# Altium PCB ESP32 with USBC.PcbDoc (part 3 of 3)
Units mil, origin at the board's own origin, x right, y up, seen from the top; angles counter-clockwise.
Board outline 2700 x 1000 mil, 4 copper layers (L1, L2, L3, L4), stack 61.583 mil thick; 64 components, 73 nets, 299 pads, 159 vias.
Unrouted connection lines stored in the file: 38.
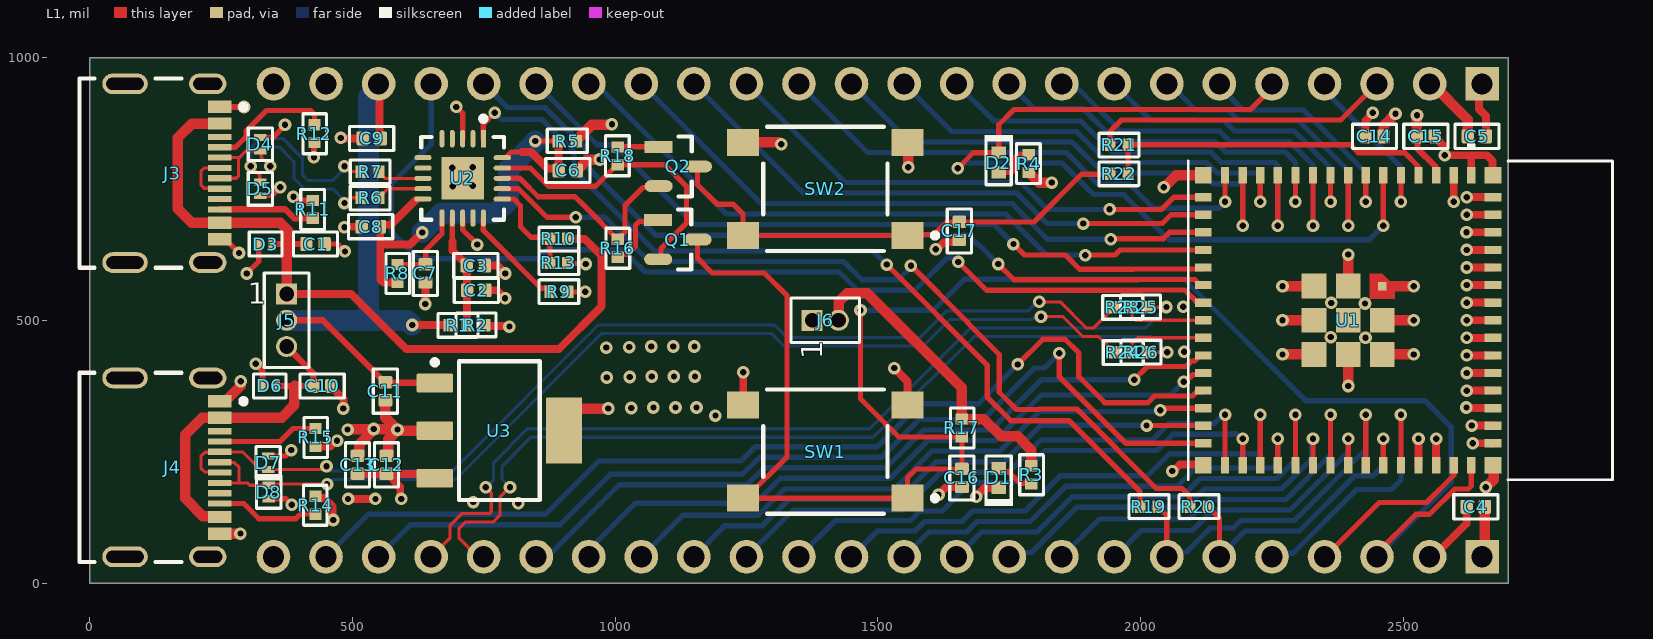
[diagram p0: L1 view]

## Via types
v1: diameter 24, hole 12, L1 to L4, 159 vias

## Nets (pads, with @x,y where several pads share a name; then routed paths per layer and width w, separated by ;. In a path a pad name is that pad's centre, name@x,y a point inside that pad or via, vN(x,y) a via of type N, cw(c..) or ccw(c..) an arc to the next point about the centre after c; other vN are vias at no path point) (continued)
BTN_GPIO0: C17.2 Q2.3 R22.1 SW2.1 SW2.2 | length 932.5
  L1 w10: Q2.3 1157,791.75 1157,758 1194,721 1224.65,721 1243.5,702.14 SW2.2 SW2.1 1558.08,663 1607,663 1631.2,687.2 C17.2 1797.2,687.2 1888,778 1940.98,778 R22.1
CHIP_PU: C16.2 J2.3 Q1.3 R17.1 SW1.1 SW1.2 U1.45 | length 3417.2
  L1 w10: Q1.3 1156.85,618.15 1185,590 1284,590 1327,547 1327,239.99 1248.43,161.42 SW1.2 SW1.1 1556.5,200.5 1573.2,217.2 C16.2@1655,217.2 ; v1(1467,519) 1467,350.76 1539.76,278 R17.1 C16.2 ; J2.3 2450,57 2524,131 2550,131 2598,179 2623.43,179 2629.29,184.86 U1.45 U1.45@2629,224.12
  L4 w10: v1(1467,519) 1606,519 1665,578 2083,578 2314,347 2541,347 2591,297 2591,191 J2.3
CON1_USB_N: D4.2 J3.A7 J3.B7 R6.1 | length 493.3
  L1 w6.03: J3.A7 279.32,770.08 283.29,774.05 283.29,807.67 285.07,809.45 ; J3.B7 285.07,809.45 ; v1@343.5,792.5 326.2,809.8 326.2,821.01 D4.2 297.83,822.2 285.07,809.45 ; v1(485,723) 495,733 R6.1
  L4 w6.03: v1(344,793) 328.51,808.49 328.51,826.47 332.05,830 361,830 389,802 389,770 409.03,749.97 462.89,749.97 485,727.86 v1(485,723)
CON1_USB_P: D5.2 J3.A6 J3.B6 R7.1 | length 462.7
  L1 w6.03: J3.B6 246.87,751.16 218.36,751.16 211.99,757.54 211.99,783.38 218.36,789.76 J3.A6 ; v1(307,793) 323.8,776.2 323.8,763.99 D5.2 ; v1(485,793) 495,783 R7.1
  L4 w6.03: v1(307,793) 307,827.62 325.41,846.03 367.64,846.03 405.03,808.64 405.03,776.64 415.67,766 462.86,766 485,788.14 v1(485,793)
CON2_USB_N: D7.2 J4.A7 J4.B7 R23.1 | length 2014.2
  L1 w6.03: J4.A7 246.87,211 219.61,211 211.99,218.62 211.99,241.22 219.61,248.84 246.87,248.84 J4.B7 J4.B7@247.64,249.22 ; J4.B7@247.64,248.84 J4.B7@247.64,249.22 ; v1(451,222) 446.14,222 440.14,216 D7.2 325,216 291.78,249.22 J4.B7@247.64,249.22 ; v1(1807.01,535) 1847.01,535 1897,485.01 1910.2,485.01 1949,523.82 R23.1
  L4 w6.03: v1(451,222) 459.97,213.03 689.98,213.03 968,491.05 1303.7,491.05 1327.76,466.99 1579.46,466.99 1629.85,517.37 1785.54,517.37 1803.17,535 v1(1807.01,535)
CON2_USB_P: D8.2 J4.A6 J4.B6 R24.1 | length 1957.2
  L1 w6.03: J4.B6 284.63,190.55 ; J4.A6 248.4,229.16 275.67,229.16 284.63,220.19 284.63,190.55 ; v1(452,188) 451.36,188.64 343.64,188.64 D8.2 305,186 300.45,190.55 284.63,190.55 ; v1(1810.52,506.97) 1852.38,506.97 1890.36,468.98 1920.02,468.98 1941.2,447.8 1942.39,447.8 1950,440.18 R24.1
  L4 w6.03: v1(452,188) 461,197 696.62,197 974.64,475.01 1297.06,475.01 1321.12,450.95 1586.1,450.95 1636.49,501.34 1792.18,501.34 1794.37,503.53 1807.08,503.53 v1(1810.52,506.97)
CON_ESP_USB_N: J2.20 R25.1 | length 1718
  L1 w6.23: J2.20 738,50 703.11,84.89 703.11,104 715.11,116 767.72,116 780.88,129.16 780.88,162.88 800,182 ; R25.1 2049,525 v1(2049.19,525.19)
  L4 w6.23: v1(754,182) 768.77,196.77 768.77,229.24 833.02,293.49 1484.21,293.49 1675.93,485.21 2009.21,485.21 v1(2049.19,525.19)
CON_ESP_USB_P: J2.21 R26.1 | length 1675
  L1 w6.23: J2.21 686,86 686,109.84 708.39,132.23 761,132.23 764.65,135.88 764.65,171.35 754,182 ; R26.1 v1(2051,439)
  L4 w6.23: v1(800,182) 800,182.2 785.01,197.19 785.01,222.52 839.74,277.26 1490.93,277.26 1597.25,383.57 1597.59,383.57 1683,468.98 2021.02,468.98 v1(2051,439)
CON_GPIO0: J1.3 R21.1 | length 570.7
  L1 w10: R21.1 1942,859 1964,881 2381,881 J1.3
DTR_FTDI: Q2.2 R16.2 U2.18 | length 417.4
  L1 w10: U2.18 818.91,770 823,765.91 853.91,735 924,735 936,723 936.18,723 952,707.18 952,707 998.19,660.81 998.19,659.63 1003.82,654 R16.2 ; R16.2@1006.18,654 1011.81,659.63 1011.81,660.81 1019,668 1019,718.49 1053.31,752.8 1080.6,752.8 Q2.2
ESP_USB_N: R23.2 R25.2 U1.23 | length 156.8
  L1 w6.23: R23.2 1983.51,524.51 1983.51,507.49 1991,500 U1.23
ESP_USB_P: R24.2 R26.2 U1.24 | length 157
  L1 w6.23: R24.2 1984.24,439.26 1984.24,456.51 1994.27,466.54 U1.24
FTDI_USB_N: R6.2 U2.9 | length 91.5
  L1 w6.03: R6.2 551,734.18 567.13,750.32 U2.9
FTDI_USB_P: R7.2 U2.8 | length 89.7
  L1 w6.03: R7.2 551,781.82 562.82,770 U2.8
GND: C1.1 C2.1 C3.1 C4.1 C5.1 C6.1 C7.1 C8.1 C9.1 C10.1 C11.1 C12.1 C13.1 C14.1 C15.1 C16.1 C17.1 D1.1 D3.1 D4.1 D5.1 D6.1 D7.1 D8.1 J1.1 J1.23 J2.2 J2.24 J3.A1B12 J3.B1A12 J3.S1 J3.S2 J3.S3 J3.S4 J4.A1B12 J4.B1A12 J4.S1 J4.S2 J4.S3 J4.S4 R9.1 R11.1 R12.1 R13.1 R14.1 R15.1 SW1.3 SW1.4 SW2.3 SW2.4 U1.1 U1.2 U1.42 U1.43 U1.46 U1.47 U1.48 U1.49 U1.50 U1.51 U1.52 U1.53 U1.54 U1.55 U1.56 U1.57 U1.58 U1.59 U1.60 U1.61 U1.62 U1.63 U1.64 U1.65 U1.66 U1.67 U1.68 U1.69 U1.70 U1.71 U1.72 U1.73 U2.3 U2.13 U2.21 U3.2 U3.4 | length 4185
  L1 w10: J3.B1A12 258.46,653.94 v1(284.4,628) v1@285,628 ; v1(299,589) 322.2,612.2 D3.1 ; D5.1 347.2,737.2 v1(363,753) ; D4.1 348.8,847.8 v1@372.5,871.5 ; D7.1 372.59,241.59 v1(384,253) ; D8.1 373.59,160.41 v1(385,149) ; C1.1 472,645 v1(486,631) ; R9.1 v1(943,554) ; R13.1 911,608 943,608 v1(944,607)
  L1 w10.01: v1(698,906) 710,894 U2.3 ; U2.13 710.23,694.35 710.23,671.77 v1(738,644)
  L1 w12: J3.A1B12 v1(293.91,905.91) v1@294,906 ; v1(316,417) 329.11,403.89 329.11,375.89 D6.1 ; v1(388,735) 391.25,735 398.25,728 R11.1 ; v1(427,810) 427,836.98 R12.1
  L1 w15: R14.1 433.13,161.87 444.41,161.87 447.17,159.11 449.06,159.11 462.28,145.9 462.28,121.72 v1(464,120) ; R15.1 458.06,260 469.06,271 v1(471,271) ; C10.1 460,373.62 483,350.62 v1(483,332) ; v1(478,847) 479,846 C9.1 ; v1(485,677) 486,678 C8.1 ; v1(639,531) C7.1 ; C2.1@751.92,557.09 775.71,557.09 v1(790.71,542.09) ; C3.1 752.29,604.09 776.09,604.09 v1(791.09,589.09) ; C3.1@753.58,601.24 C3.1@753.58,604 ; SW1.4 1244,339.08 v1(1244,401) ; v1(1531,409) 1556.5,383.5 SW1.3 ; v1(1610,635) 1612.44,635 1625.92,648.48 1649.31,648.48 1653.62,652.8 C17.1 ; v1(1615.44,168) 1630.23,182.8 C16.1 ; v1@1687,164.85 1703.02,180.87 1729.57,180.87 D1.1 ; v1(2060,213) 2062.44,213 2074.64,225.2 2118.65,225.2 U1.64 ; C14.1 2427.8,879.8 2442,894 v1(2442,895) ; U1.42 v1(2528.9,274.57) ; J2.2 2557,50 2620.59,113.59 C4.1 ; C15.1 2561,850 2561,847.62 2579,829.62 v1(2579,814) 2628,814 ; U1.43 v1(2562.36,274.57) ; v1(2595.83,725.43) U1.2 ; v1(2620,334) 2620.95,333.05 2670.26,333.05 U1.48 ; v1(2620.09,667.43) U1.58@2670.24,667.43 ; v1(2620.47,366.14) U1.49 ; v1(2620.47,399.61) U1.50 ; v1(2620.47,433.07) U1.51 ; v1(2620.47,466.54) U1.52 ; v1(2620.47,500) U1.53 ; v1(2620.47,533.46) U1.54 ; v1(2620.47,566.93) U1.55 ; v1(2620.47,600.39) U1.56 ; v1(2620.47,633.86) U1.57 ; v1(2620.47,700.79) U1.59 ; v1(2620.47,734.25) U1.60 ; U1.1 2629.29,812.71 2628,814 ; v1(2630.41,299.59) 2670.26,299.59 U1.47 ; v1(2632,266) 2632.13,265.87 2670.5,265.87 U1.46 ; J1.1 2644,944 2644,902 2657.2,888.8 C5.1 ; U1.65 U1.65@2672,223.04 ; U1.62 2670,776.22 2670,803 2659,814 2628,814
  L1 w20: J4.B1A12 v1(287.09,94.09) ; J4.A1B12 258.46,346.06 288,375.6 v1(288,384) ; v1(491,292) 491.5,292.5 540.5,292.5 v1(541,293) ; C13.1 511.38,242.2 513.19,244.02 513.19,264.11 541,291.92 v1(541,293) ; C11.1 563,315 v1@585.5,292.5 ; C12.1 566.38,242.2 568.19,244.02 568.19,273.11 586,290.92 v1(586,292) ; U3.2 589.08,290 587.08,292 v1(586,292) ; U3.4 903.03,307.55 927.48,332 v1(987,332) ; C6.1 927.2,786.38 929.02,788.19 930.39,788.19 947.44,805.23 970.23,805.23 v1(971,806) ; SW2.4 1311.33,838.58 1314.92,835 v1(1316,835) ; SW2.3 1557.75,837.33 v1(1557.75,791.33) ; v1(2044,753) 2045.08,753 2067.67,775.59 U1.63 ; v1(2270.04,564.96) v1(2270.04,564.96) U1.71 ; v1(2270.04,435.04) U1.73 ; v1(2270.04,500) U1.72 ; v1(2395.04,375) U1.70 ; U1.69 v1(2395.04,625) ; U1.68 v1(2520.04,435.04) ; U1.67 v1(2520.04,500) ; U1.66 v1(2520.04,564.96) ; v1(2657,182) 2672,197 U1.65@2672,223.04 ; v1(541,293) 541.5,292.5 v1@585.5,292.5 ; v1@585.5,292.5 v1(586,292)
  other v1: 816,152 730,154 1687,164 1031,333 1073,334 1115,334 1155,334 984,391 1028,392 1070,393 1112,393 1152,393 2083,440 983,448 1027,449 1069,450 1111,450 1151,450 2428,467 2362,468 2081,526 2427,532 2363,533 691,755 729,756 690,790 729,791 372,872
GPIO0: R21.2 R22.2 U1.4 | length 641.8
  L1 w10: R22.2 R21.2 2399.31,834 2414.31,819 2502.04,819 2528.9,792.14 U1.4
GPIO1: J1.4 U1.5 | length 335
  L1 w10: v1(2495.43,725.43) U1.5
  L4 w10: J1.4 2350,937 2495.43,791.57 v1(2495.43,725.43)
GPIO2: D2.1 J1.5 U1.6 | length 1682.1
  L1 w10: v1(1652,789) 1681.7,818.7 D2.1 1730,872 1759,901 2209,901 2250,942 J1.5 ; v1(2461.97,680.04) U1.6
  L4 w10: v1(1652,789) 1654.64,789 1664.86,799.22 1850.5,799.22 1910.22,739.5 1967.54,739.5 2054,653.04 2434.97,653.04 v1(2461.97,680.04)
GPIO3: J1.6 U1.7 | length 457.4
  L1 w10: v1(2428.5,725.43) U1.7
  L4 w10: J1.6 2150,945 2195,900 2310,900 2428.5,781.5 v1(2428.5,725.43)
GPIO4: J1.7 U1.8 | length 613.9
  L1 w10: v1(2395.04,680.04) U1.8
  L4 w10: J1.7 2055,950 2105,900 2166.72,900 2186.72,880 2300,880 2395.04,784.96 v1(2395.04,680.04)
GPIO5: J1.8 U1.9 | length 592.7
  L1 w10: v1(2361.57,725.43) U1.9
  L4 w10: J1.8 2020,880 2158.43,880 2178.43,860 2291.72,860 2361.57,790.14 v1(2361.57,725.43)
GPIO6: J1.9 U1.10 | length 753
  L1 w10: v1(2328.11,680.04) U1.10
  L4 w10: J1.9 1860.33,939.67 1882.33,939.67 1962,860 2150.15,860 2170.15,840 2283.43,840 2328.11,795.32 v1(2328.11,680.04)
GPIO7: J1.10 U1.11 | length 731.7
  L1 w10: v1(2294.65,725.43) U1.11
  L4 w10: J1.10 1797,903 1890.72,903 1953.72,840 2141.86,840 2161.86,820 2275,820 2294.65,800.35 v1(2294.65,725.43)
GPIO8: J1.11 U1.12 | length 885.2
  L1 w10: v1(2261.18,680.04) U1.12
  L4 w10: J1.11 1720.78,879.22 1886.22,879.22 1945.43,820 2133.58,820 2153.58,800 2255,800 2261.18,793.82 v1(2261.18,680.04)
GPIO9: J1.12 U1.13 | length 849.4
  L1 w10: v1(2227.72,725.43) U1.13
  L4 w10: J1.12 1640.78,859.22 1877.93,859.22 1937.15,800 2125.29,800 2145.29,780 2221.86,780 2227.72,774.14 v1(2227.72,725.43)
GPIO10: J1.13 U1.14 | length 996.1
  L1 w10: v1(2194.25,680.04) U1.14
  L4 w10: J1.13 1560.78,839.22 1869.65,839.22 1928.86,780 2117.01,780 2137.01,760 2189.14,760 2195,754.14 2195,680.79 v1(2194.25,680.04)
GPIO11: J1.14 U1.15 | length 964.3
  L1 w10: v1(2160.79,725.43) U1.15
  L4 w10: J1.14 1480.78,819.22 1858.78,819.22 1918.5,759.5 1978.5,759.5 2025,713 2147.93,713 2160.36,725.43 v1(2160.79,725.43)
GPIO12: J1.15 U1.16 | length 978.1
  L1 w10: v1(1941,711) 2040,711 2055,726 2055.18,726 2063.44,734.25 U1.16
  L4 w10: J1.15 1438,762 1772,762 1823,711 v1(1941,711)
GPIO13: J1.16 U1.17 | length 1086.6
  L1 w10: v1(1891,684) 2041.28,684 2058.07,700.79 U1.17
  L4 w10: J1.16 1358,742 1763.72,742 1821.72,684 v1(1891,684)
GPIO14: J1.17 U1.18 | length 1197.6
  L1 w10: v1(1943,654) 1944,655 2043,655 2055.32,667.32 U1.18
  L4 w10: J1.17 1278,722 1755.43,722 1823.43,654 v1(1943,654)
GPIO15: J1.18 U1.19 | length 1308.6
  L1 w10: v1(1895,624) 1951.18,624 1961.04,633.86 U1.19
  L4 w10: J1.18 964,950 1212,702 1743,702 1821,624 v1(1895,624)
GPIO16: J1.19 U1.20 | length 1417.1
  L1 w10: v1(1758,645) 1779,624 1856.82,624 1883.82,597 1986.34,597 1986.86,597.52 2116.57,597.52 U1.20
  L4 w10: J1.19 857.23,942.77 966,834 998,834 1150,682 1721,682 v1(1758,645)
GPIO17: J1.20 U1.21 | length 1558.9
  L1 w10: v1(1729,607) 1759,577 1994.62,577 1995.14,577.52 2102.84,577.52 2108.7,571.66 2108.7,569.8 2111.57,566.93 U1.21
  L4 w10: J1.20@760,950 J1.20 795,905 866.72,905 944,827.72 944,794.82 959.82,779 1076.82,662 1672,662 1690,644 1692,644 v1(1729,607)
GPIO18: J1.21 U1.22 | length 1979.7
  L1 w10: v1(1653,611) 1707,557 2002.91,557 2003.43,557.52 2084.02,557.52 2105.2,536.34 2116.57,536.34 U1.22
  L4 w10: J1.21 650,835 574,759 574,669 626,617 854,617 871,634 1014.72,634 1031.72,617 1056.72,592 1426.72,592 1461.72,557 1570.18,557 1631.86,618.67 1641.54,618.67 1649.21,611 v1(1653,611)
GPIO21: J2.19 U1.25 | length 1429.2
  L1 w10: v1(1988,387) 2013,412 2086.5,412 2096.98,422.48 2102.84,422.48 2108.7,428.34 2108.7,430.2 2111.57,433.07 U1.25
  L4 w10: J2.19 860.33,60.33 881.33,60.33 1008,187 1251,187 1283.14,219.14 1515.01,219.14 1586.86,291 1715.58,291 1811.58,387 v1(1988,387)
GPIO26: J2.18 U1.26 | length 1321.9
  L1 w10: v1(2082,383) 2085.79,383 2099.52,396.73 2116.57,396.73 U1.26
  L4 w10: J2.18 950,63 1039,152 1267.15,152 1314.29,199.14 1523.29,199.14 1595.15,271 1723.86,271 1810.86,358 2057,358 v1(2082,383)
GPIO33: J2.17 U1.28 | length 1186.5
  L1 w10: v1(2037.66,328.66) 2041.45,328.66 2045.47,332.68 U1.28
  L4 w10: J2.17 1129.14,129.14 1272.57,129.14 1322.57,179.14 1531.57,179.14 1603.43,251 1732.15,251 1807.75,326.61 2026.14,326.61 2026.86,327.32 2036.32,327.32 v1(2037.66,328.66)
GPIO34: J2.16 U1.29 | length 1073.3
  L1 w10: v1(2011.39,299.61) 2119.06,299.61 U1.29
  L4 w10: J2.16 1209.14,109.14 1280.86,109.14 1330.86,159.14 1539.86,159.14 1611.72,231 1740.43,231 1809.43,300 2011,300 v1(2011.39,299.61)
GPIO35: J2.15 U1.31 | length 1118.2
  L1 w10: U1.31 v1(2160.79,319.96)
  L4 w10: J2.15 1339.14,139.14 1548.14,139.14 1620,211 1748.72,211 1809.95,272.23 2022.95,272.23 2053.72,303 2140.04,303 2157,319.96 v1(2160.79,319.96)
GPIO36: J2.14 U1.32 | length 995.6
  L1 w10: U1.32 v1(2194.25,274.57)
  L4 w10: J2.14 1419.14,119.14 1562.57,119.14 1580.43,137 1622.62,137 1649.22,163.6 1649.22,164.4 1675.82,191 1757,191 1818.23,252.23 2031.23,252.23 2062,283 2173,283 2173.86,283.86 2182.14,283.86 2191.43,274.57 v1(2194.25,274.57)
GPIO37: J2.13 U1.33 | length 1025.6
  L1 w10: U1.33 v1(2227.72,319.96)
  L4 w10: J2.13 1499.14,99.14 1570.86,99.14 1588.72,117 1660.43,117 1680.43,137 1780.97,137 1786.83,142.86 1786.83,143.83 1847,204 2012.82,204 2054.82,246 2221.86,246 2227.72,251.86 v1(2227.72,319.96)
GPIO38: J2.12 U1.34 | length 881.3
  L1 w10: U1.34 v1(2261.18,274.57)
  L4 w10: J2.12 1597,97 1668.72,97 1688.72,117 1789.95,117 1856.95,184 2069.86,184 2104.86,219 2251.58,219 2261.18,228.6 v1(2261.18,274.57)
GPIO39: J2.11 U1.35 | length 902.4
  L1 w10: U1.35 v1(2294.65,319.96)
  L4 w10: J2.11 1697,97 1798.23,97 1802.25,97 1802.63,97.38 cw(c1850,50) 1807.56,101.85 1869.72,164 2078.15,164 2113.15,199 2259.86,199 2294.65,233.78 v1(2294.65,319.96)
GPIO40: J2.10 U1.36 | length 742.2
  L1 w10: U1.36 v1(2328.11,274.57)
  L4 w10: J2.10 1758.23,58.23 1792.23,58.23 1813.06,79.06 cw(c1850,50) 1820.94,86.94 1878,144 2086.43,144 2121.43,179 2268.15,179 2325.43,236.28 2325.43,271.89 v1(2328.11,274.57)
GPIO41: J2.9 U1.37 | length 763.4
  L1 w10: U1.37 v1(2361.57,319.96)
  L4 w10: J2.9 1922,122 2092.72,122 2129.72,159 2276.43,159 2361.57,244.14 v1(2361.57,319.96)
GPIO42: J2.8 U1.38 | length 603.3
  L1 w10: U1.38 v1(2395.04,274.57)
  L4 w10: J2.8 1951,50 2001,100 2099,100 2138,139 2284.72,139 2395.36,249.64 2395.36,274.25 v1(2395.04,274.57)
GPIO45: J2.5 U1.41 | length 525.3
  L1 w10: U1.41 v1(2495.43,319.96)
  L4 w10: J2.5 2256.73,56.73 2289.73,56.73 2411,178 2477.15,178 2495.43,196.29 v1(2495.43,319.96)
GPIO46: J2.4 U1.44 | length 329.4
  L1 w10: J2.4 2351,50 2454.14,153.14 2543.86,153.14 2595.83,205.11 U1.44
GPIO47: J2.23 U1.27 | length 1927.1
  L1 w10: v1(1766,416) 1814,464 1856.18,464 1882.52,437.66 1882.52,392.48 1932,343 2013.82,343 2026.48,355.66 2098.66,355.66 2106.27,363.27 2116.57,363.27 U1.27
  L4 w10: J2.23 531,131 867.72,131 969,232.28 1239.72,232.28 1266.57,259.14 1498.44,259.14 1580.29,341 1691,341 v1(1766,416)
GPIO48: J2.22 U1.30 | length 1826.5
  L1 w10: v1(1845,437) 1845,393 1972.25,265.75 U1.30
  L4 w10: J2.22 611,111 895,111 991,207 1242.72,207 1274.86,239.14 1506.72,239.14 1578.58,311 1700,311 1798,409 1817,409 v1(1845,437)
NetC7_2: C7.2 R8.2 U2.11 | length 154.6
  L1 w10: R8.2 586.1,606.1 638.9,606.1 C7.2 639.83,607.04 639.83,633.83 667,661 670.63,664.63 U2.11
NetD1_2: D1.2 R3.1 | length 74.3
  L1 w10: D1.2 1736.81,211.89 1748.11,211.89 1770,190 1791,190 R3.1
NetD2_2: D2.2 R4.1 | length 83.9
  L1 w10: D2.2 1754.14,781.3 1760,787.16 1760,809.16 1765.86,815.02 R4.1
NetJ3_A5: J3.A5 R12.2 | length 238.8
  L1 w10: J3.A5 277.71,829.13 298.19,849.61 298.19,860.9 306.98,869.69 307.47,869.69 336.78,899 421,899 428,892 R12.2
NetJ3_B5: J3.B5 R11.2 | length 184.4
  L1 w12: J3.B5 372.38,711.02 389.42,693.98 R11.2
NetJ4_A5: J4.A5 R15.2 | length 192.6
  L1 w10: J4.A5 362.29,269.29 387,294 R15.2
NetJ4_B5: J4.B5 R14.2 | length 198.1
  L1 w10: J4.B5 293.31,151.18 321.98,122.52 392.7,122.52 401.59,131.41 429.58,131.41 R14.2
NetQ1_1: Q1.1 R16.1 | length 129.8
  L1 w10: R16.1 1010.63,625.61 1023.61,625.61 1039,641 1039,681 1046.14,688.14 1079.14,688.14 Q1.1
NetQ2_1: Q2.1 R18.1 | length 78
  L1 w10: R18.1 Q2.1
NetR9_2: R9.2 U2.15 | length 199.6
  L1 w10: U2.15 749.37,670.63 759,661 859.19,560.81 870.35,560.81 875.98,555.18 R9.2
RTS_FTDI: Q1.2 R18.2 U2.19 | length 560
  L1 w10: U2.19 823,789.68 838.5,789.68 873.18,755 962.83,755 1003.82,795.98 1094.81,795.98 1136,754.79 1136,685.35 1087.26,636.6 1087.26,621.45 Q1.2
RXD_FTDI: R19.2 U2.1 | length 1670.7
  L1 w10: U2.1 749.37,873.37 v1(771,895) ; v1(1517,606) 1708,415 1708,354 1753,309 1864,309 1998.98,174.02 R19.2
  L4 w10: v1(771,895) 784,882 861,882 922,821 922,785.5 1075.5,632 1491,632 v1(1517,606)
TXD_FTDI: R20.2 U2.17 | length 1638.7
  L1 w10: U2.17 816,750.32 870.32,696 v1(925,696) ; v1(1563,604) 1671,496 1671,495 1731,435 1731,363 1764,330 1806,330 1807,331 1878.72,331 2029.72,180 2079,180 2093.05,165.95 2093.05,145.93 R20.2
  L4 w10: v1(925,696) 981,696 1065,612 1435,612 1470,577 1539,577 1563,601 v1(1563,604)
U0RXD: J2.6 R20.1 U1.40 | length 588.9
  L1 w10: R20.1 2150,122.99 J2.6 ; U1.40 v1(2461.97,274.57)
  L4 w10: J2.6 2199,99 2302,99 2407,204 2442,204 2461.97,223.97 v1(2461.97,274.57)
U0TXD: J2.7 R19.1 U1.39 | length 727
  L1 w10: R19.1 2032.99,143.82 2038.62,138.19 2039.8,138.19 2050,127.99 J2.7 ; U1.39 v1(2428.5,319.96)
  L4 w10: J2.7 2059.23,59.23 2087.23,59.23 2132.64,104.64 2176.36,104.64 2190.72,119 2293,119 2428.5,254.5 v1(2428.5,319.96)
VBUS_SENSE: R10.1 R13.2 U2.16 | length 191.4
  L1 w10: U2.16 807.37,730.63 820,718 820,678 840,658 873,658 R10.1 R13.2
pads on no net: J1.24 J3.A8 J3.B8 J4.A8 J4.B8 U2.2 U2.4 U2.5 U2.6 U2.7 U2.14

## Polygon pours and split planes (outlines as drawn)
GND on L3 (split plane): 2679.9,20.1 20.1,20.1 20.1,979.9 2679.9,979.9

## Text inside footprints (layer, text, board x,y; h text height)
J1: Bottom Overlay "1" at 2626,866 h40 r270
J2: Bottom Overlay "1" at 2626,-34 h40 r270
J5: Top Overlay "1" at 301,531 h40
J6: Top Overlay "1" at 1394,426 h40 r90